# Altium PCB PCB3.PcbDoc
Units mm, origin at the board's own origin, x right, y up, seen from the top; angles counter-clockwise.
Board outline 119.13 x 133.35 mm, 4 copper layers (Top Layer, GND, VCC, Bottom Layer), stack 0.603 mm thick; 55 components, 46 nets, 276 pads, 242 vias.
Unrouted connection lines stored in the file: 1.
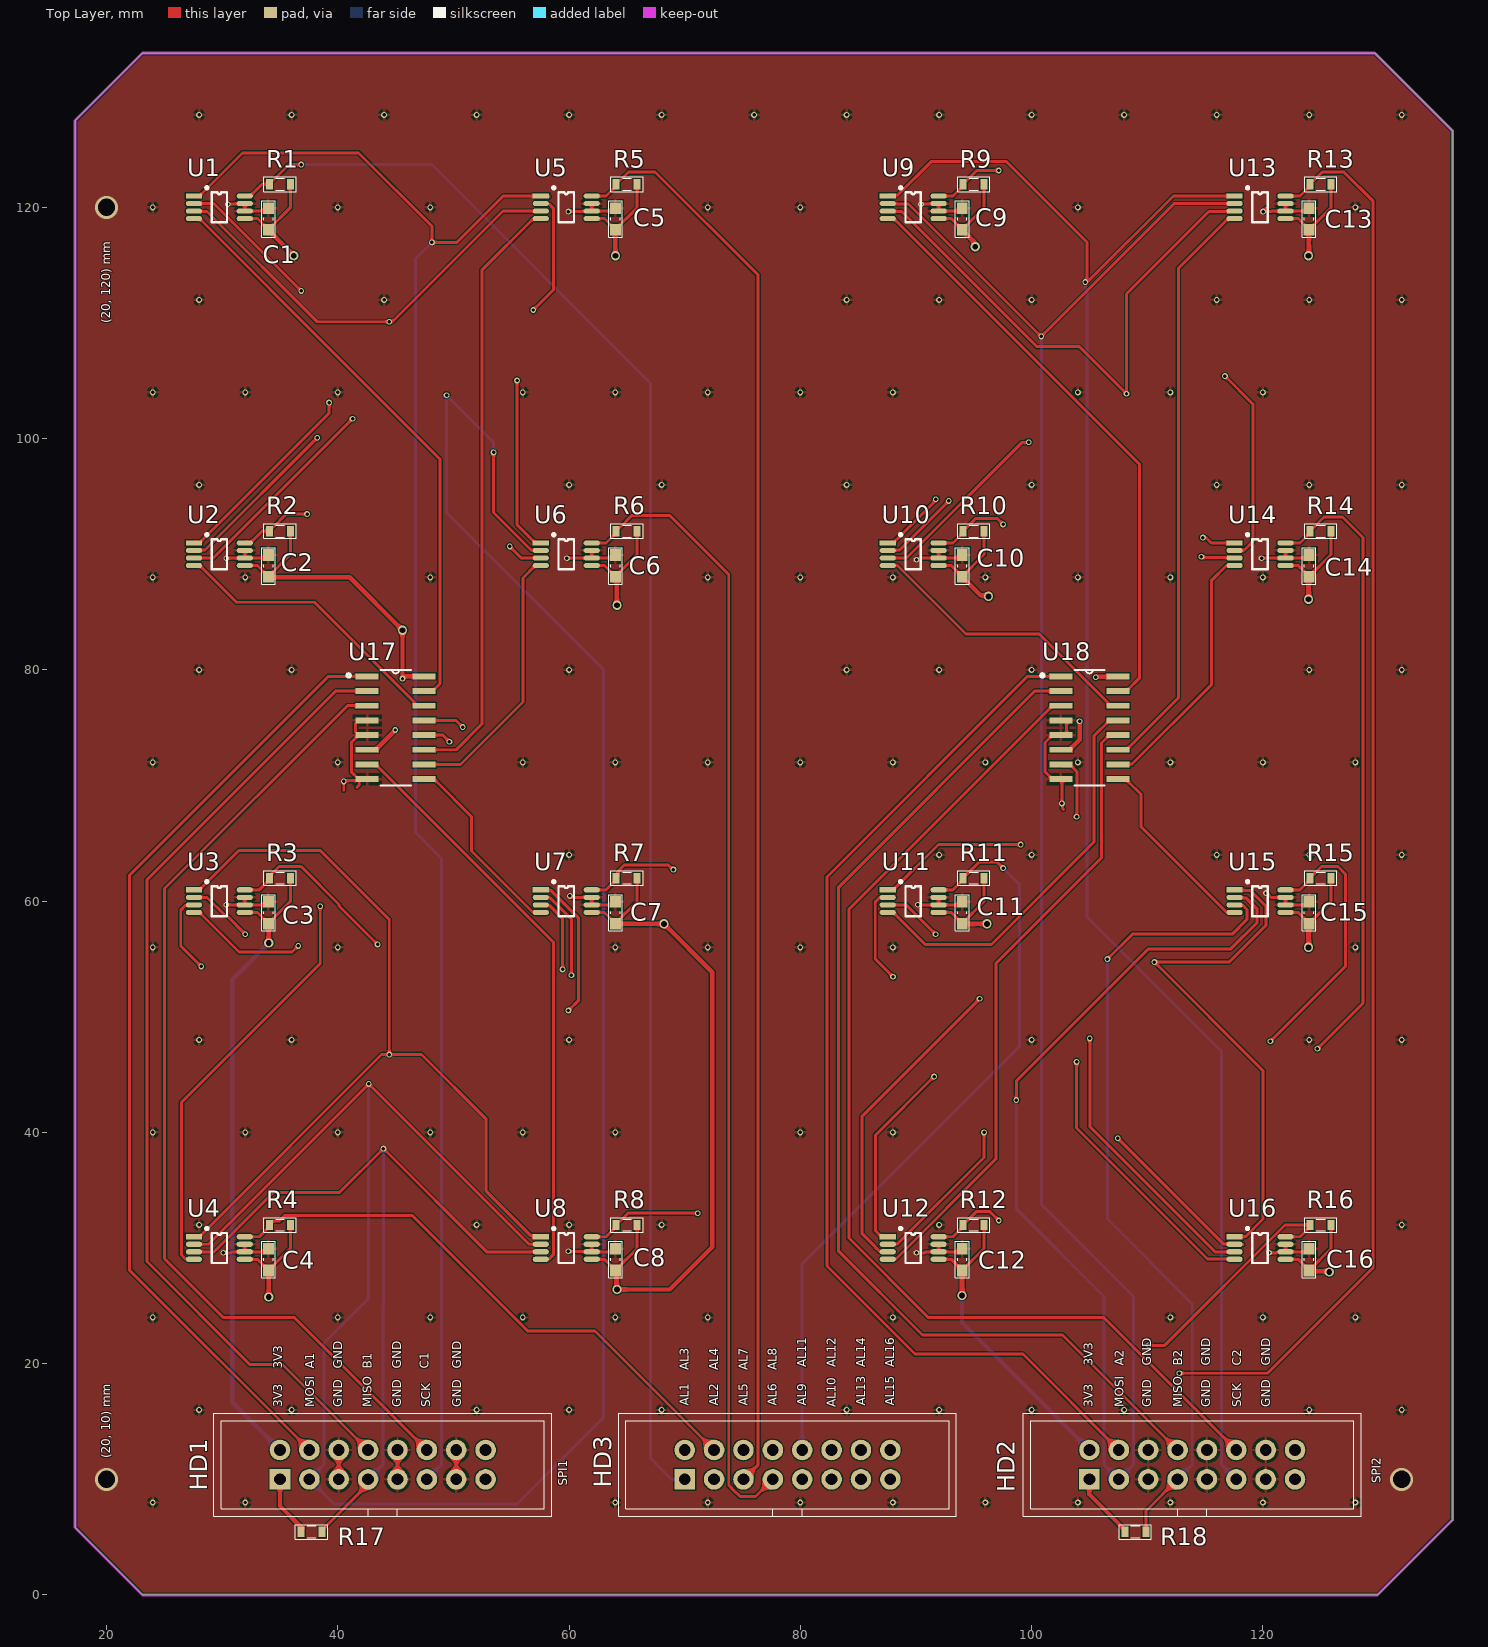
[diagram p0: Top Layer view]
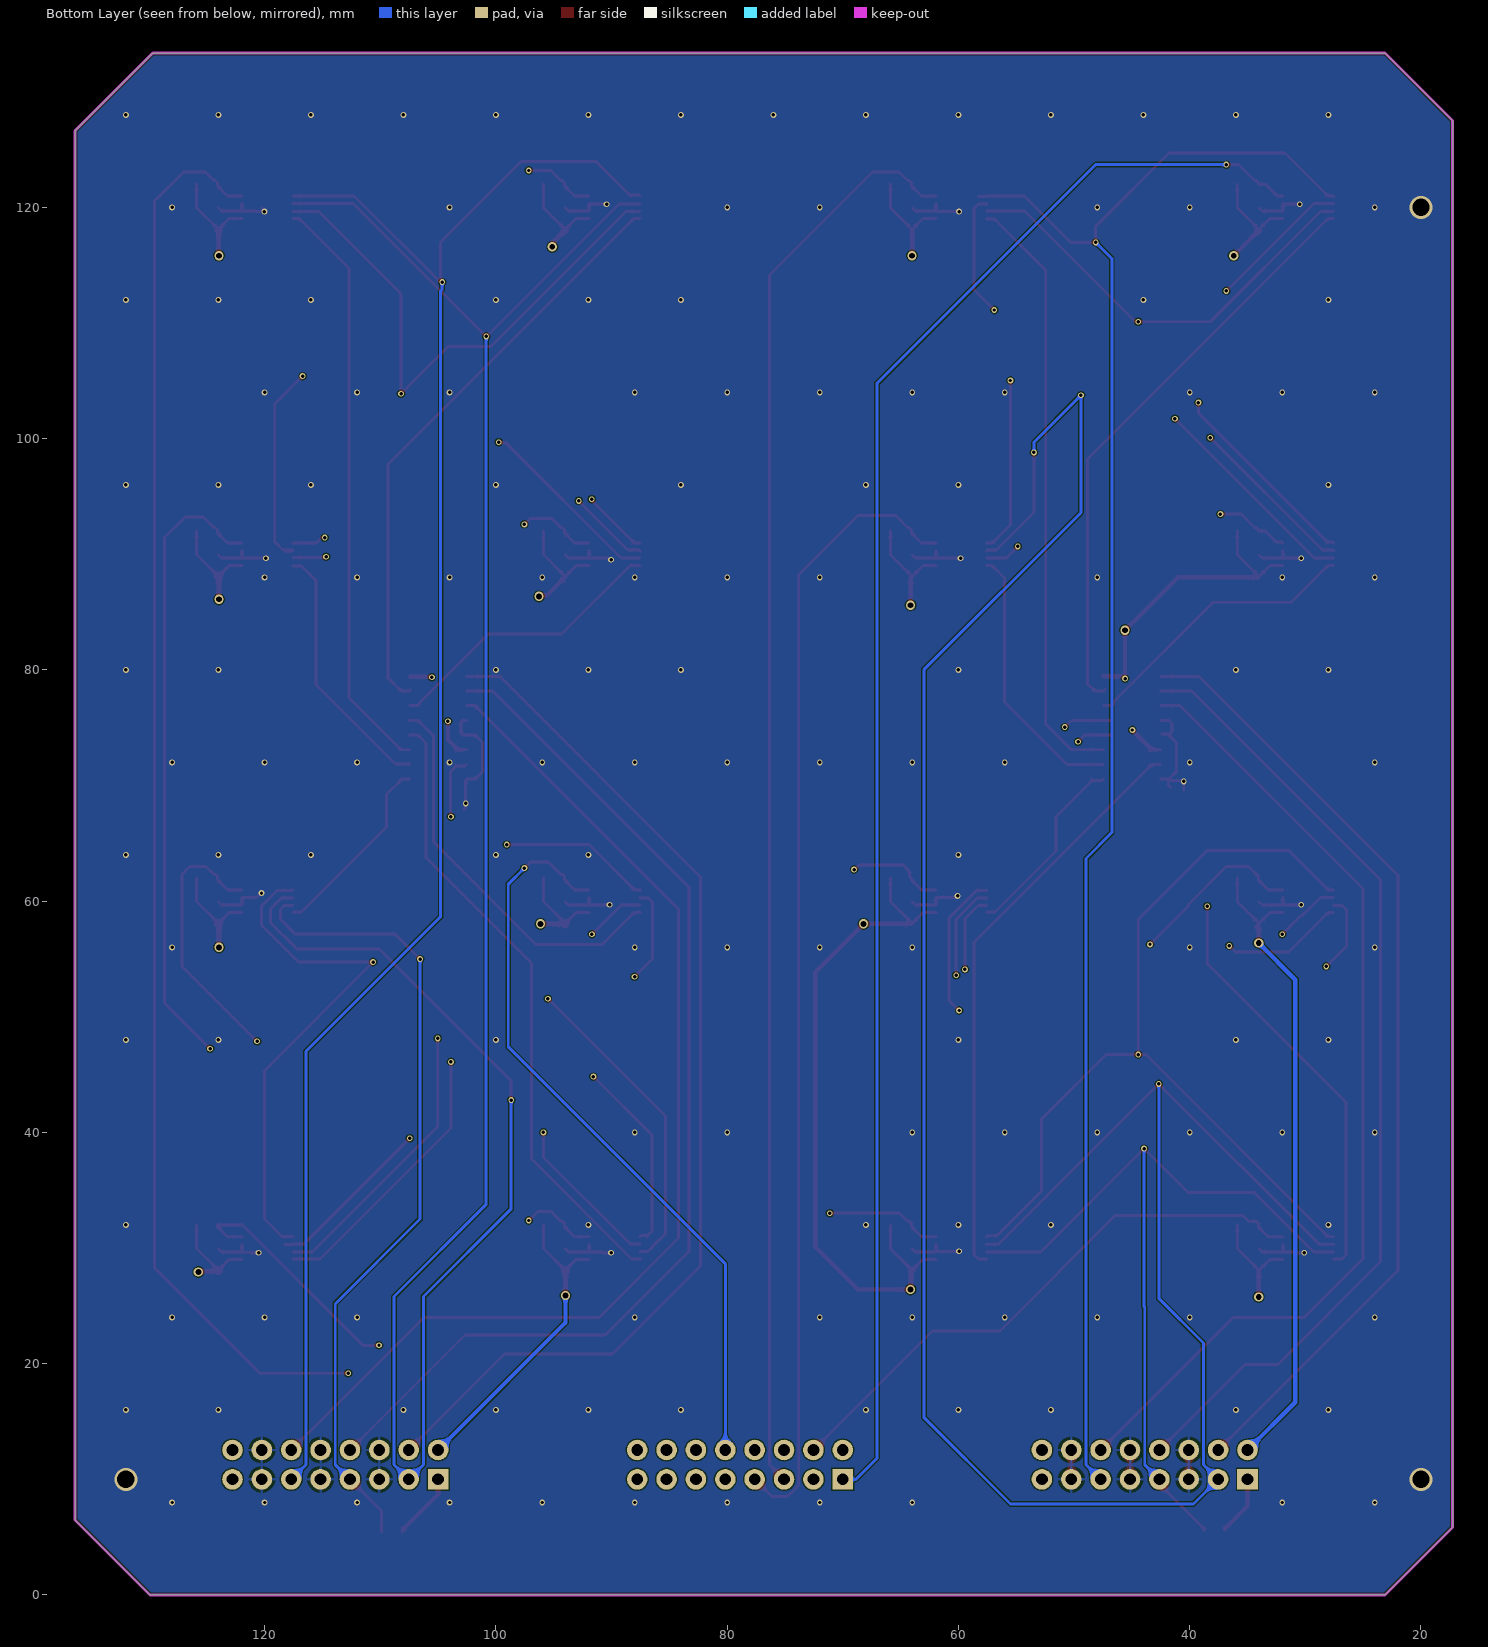
[diagram p1: Bottom Layer view, seen from below]
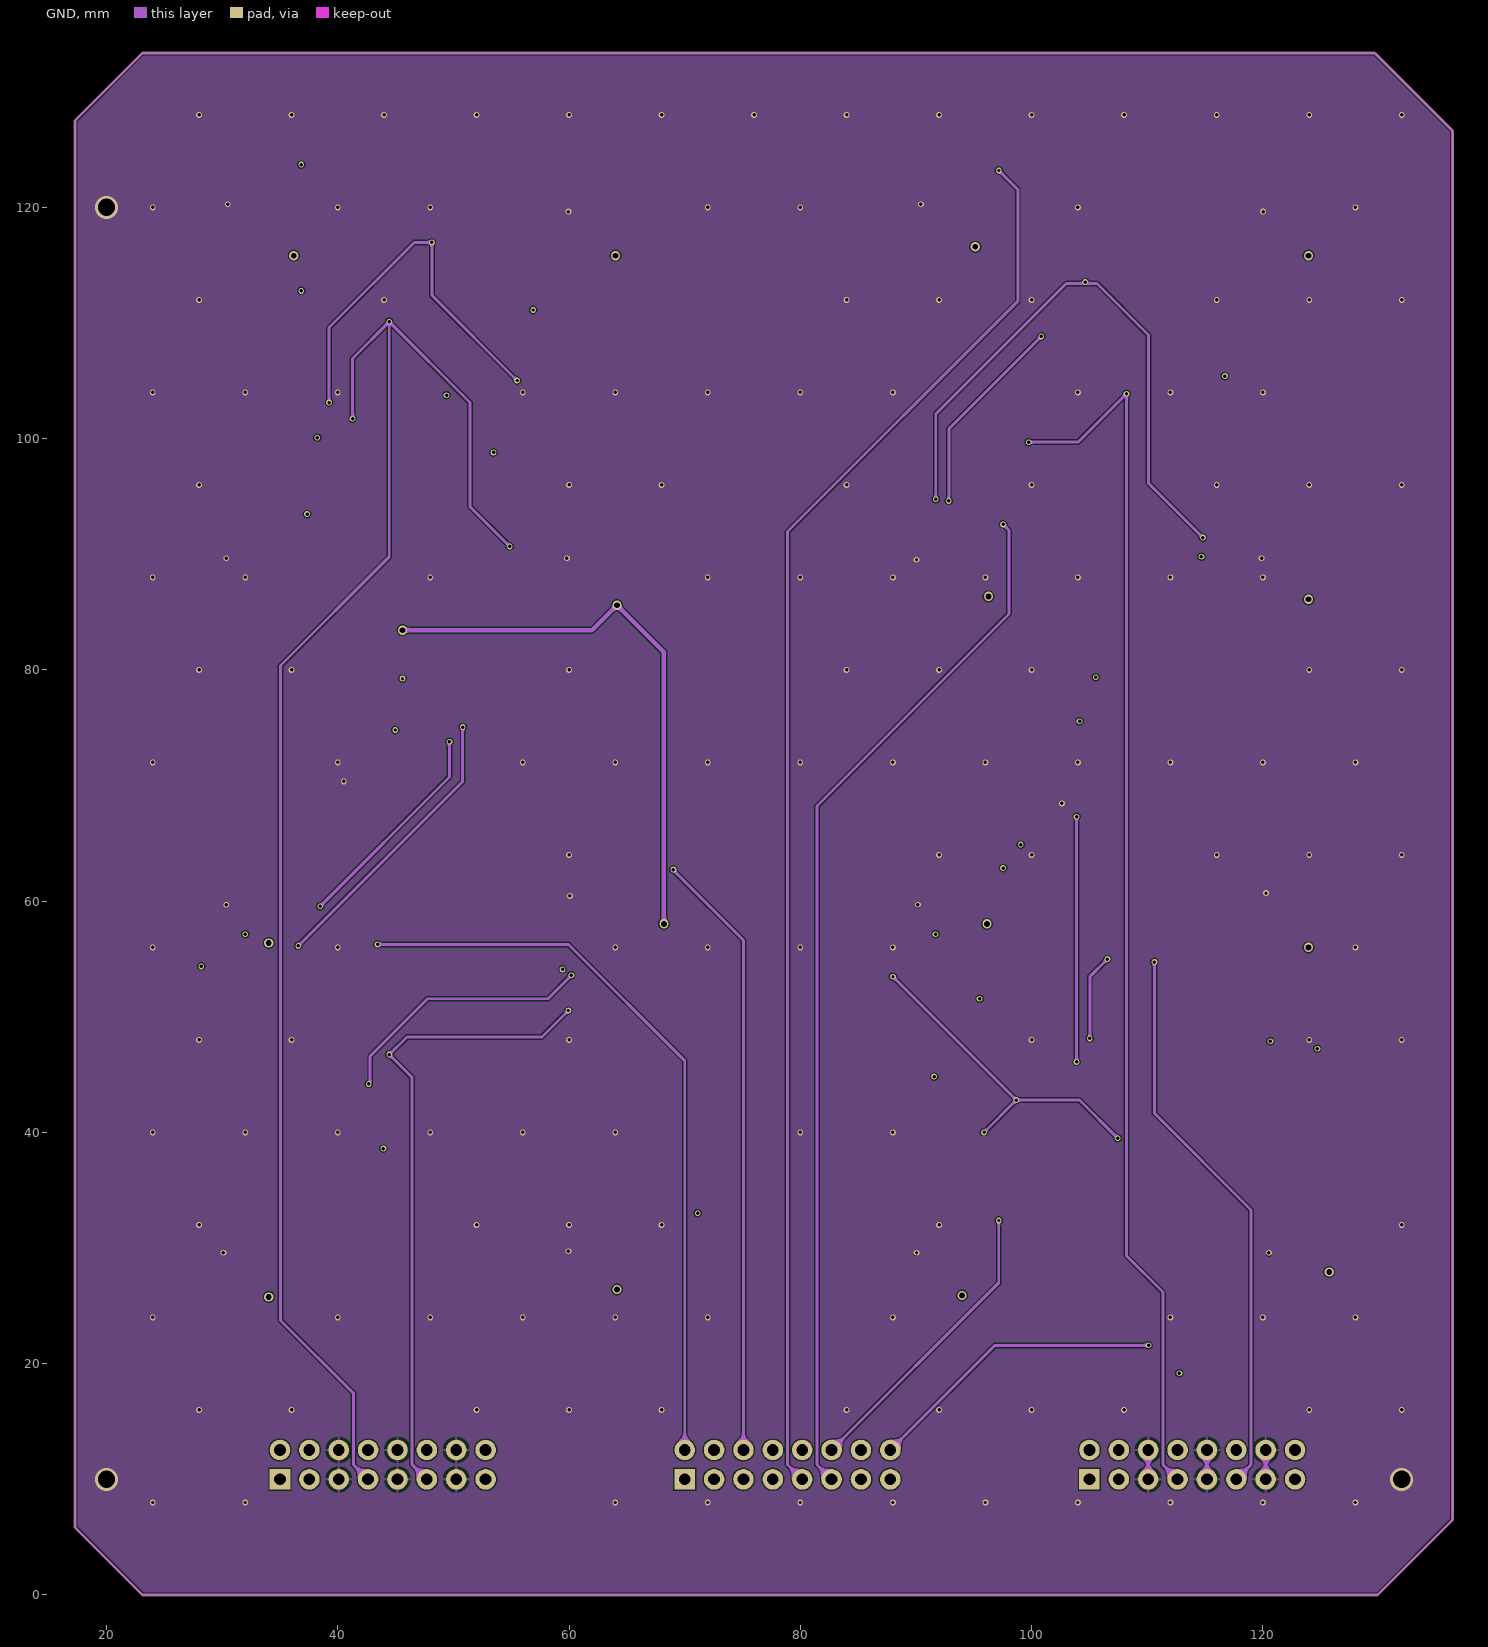
[diagram p2: GND]
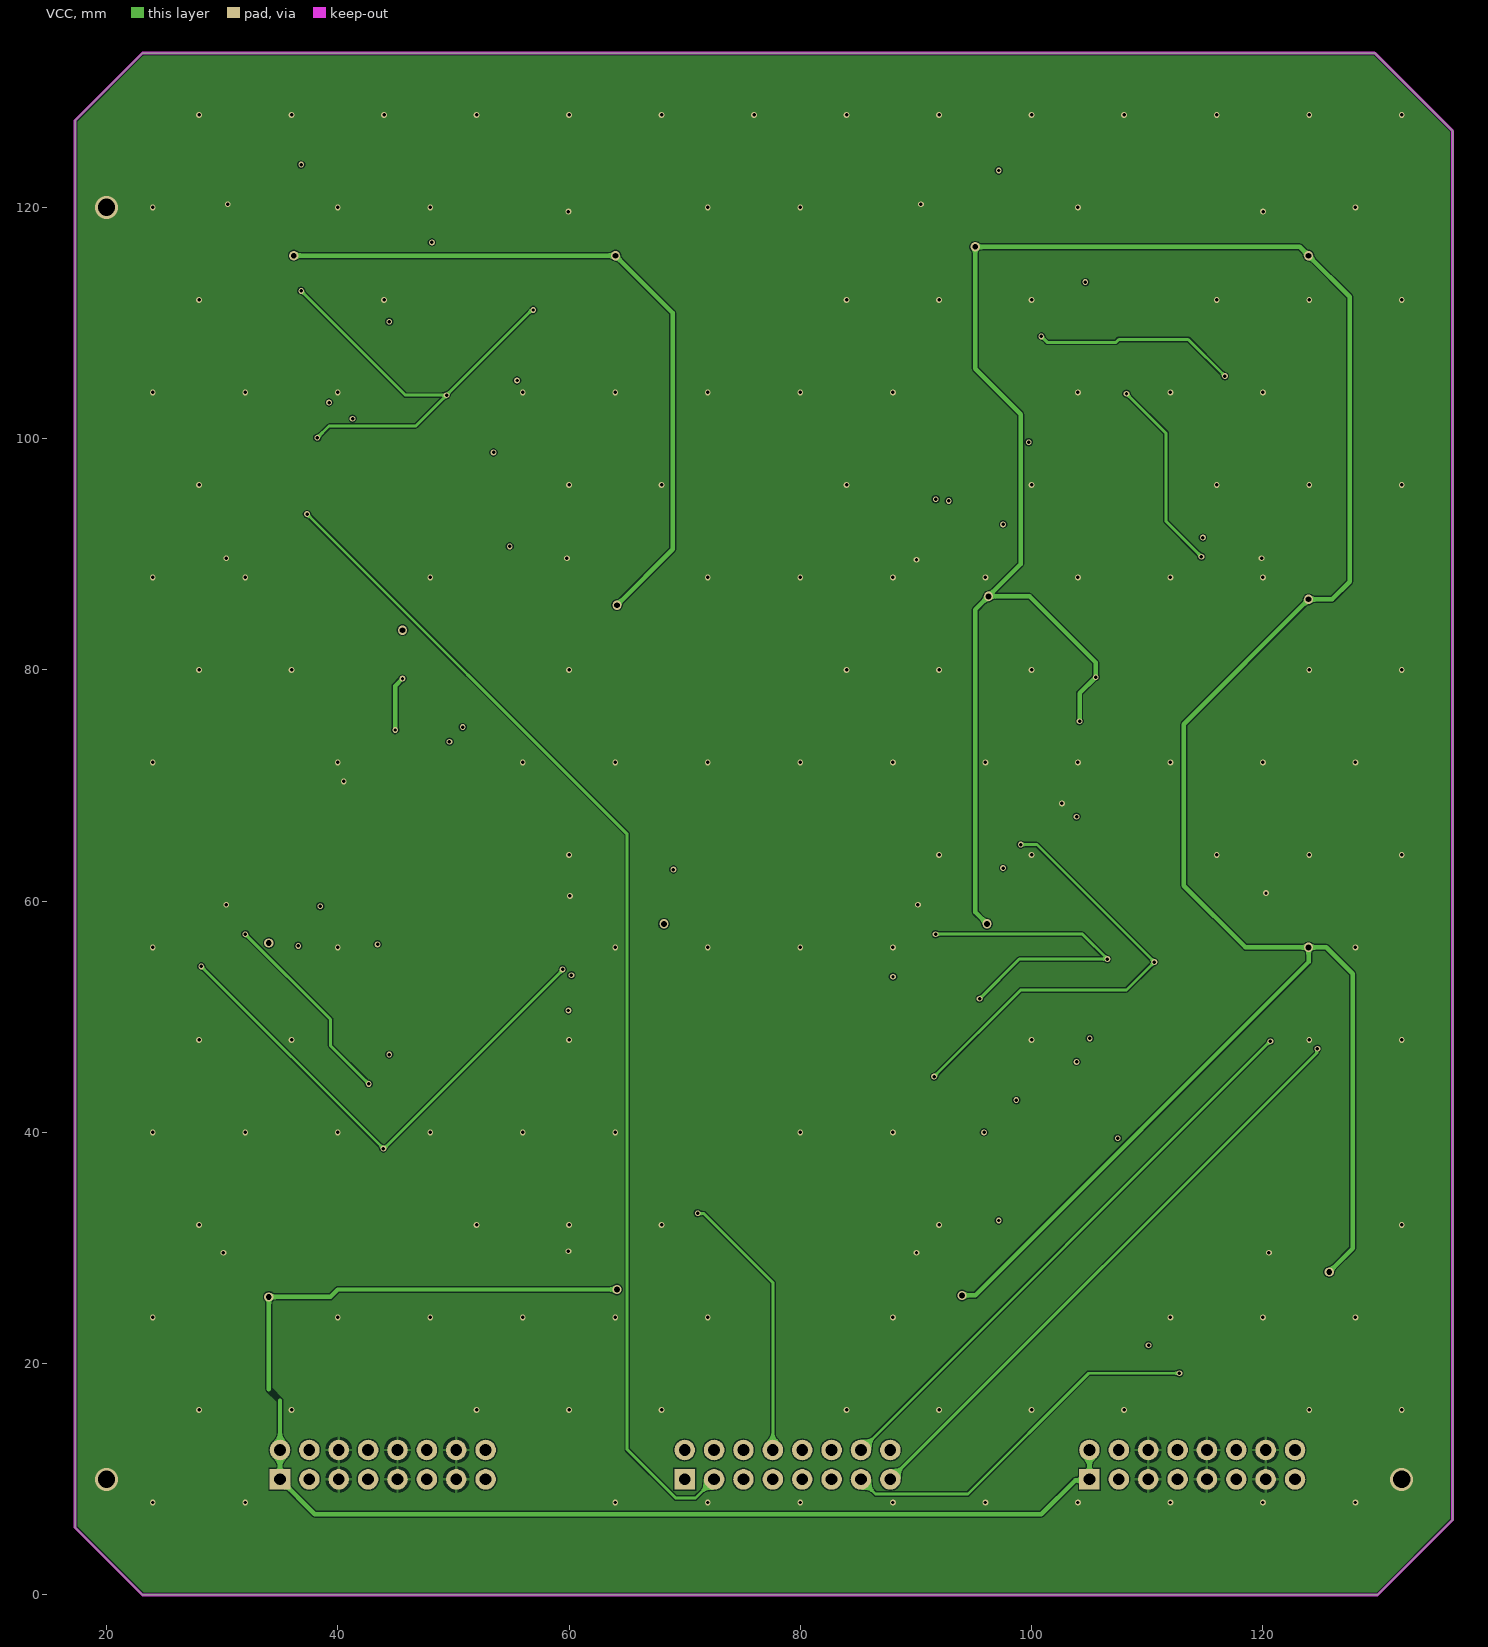
[diagram p3: VCC]
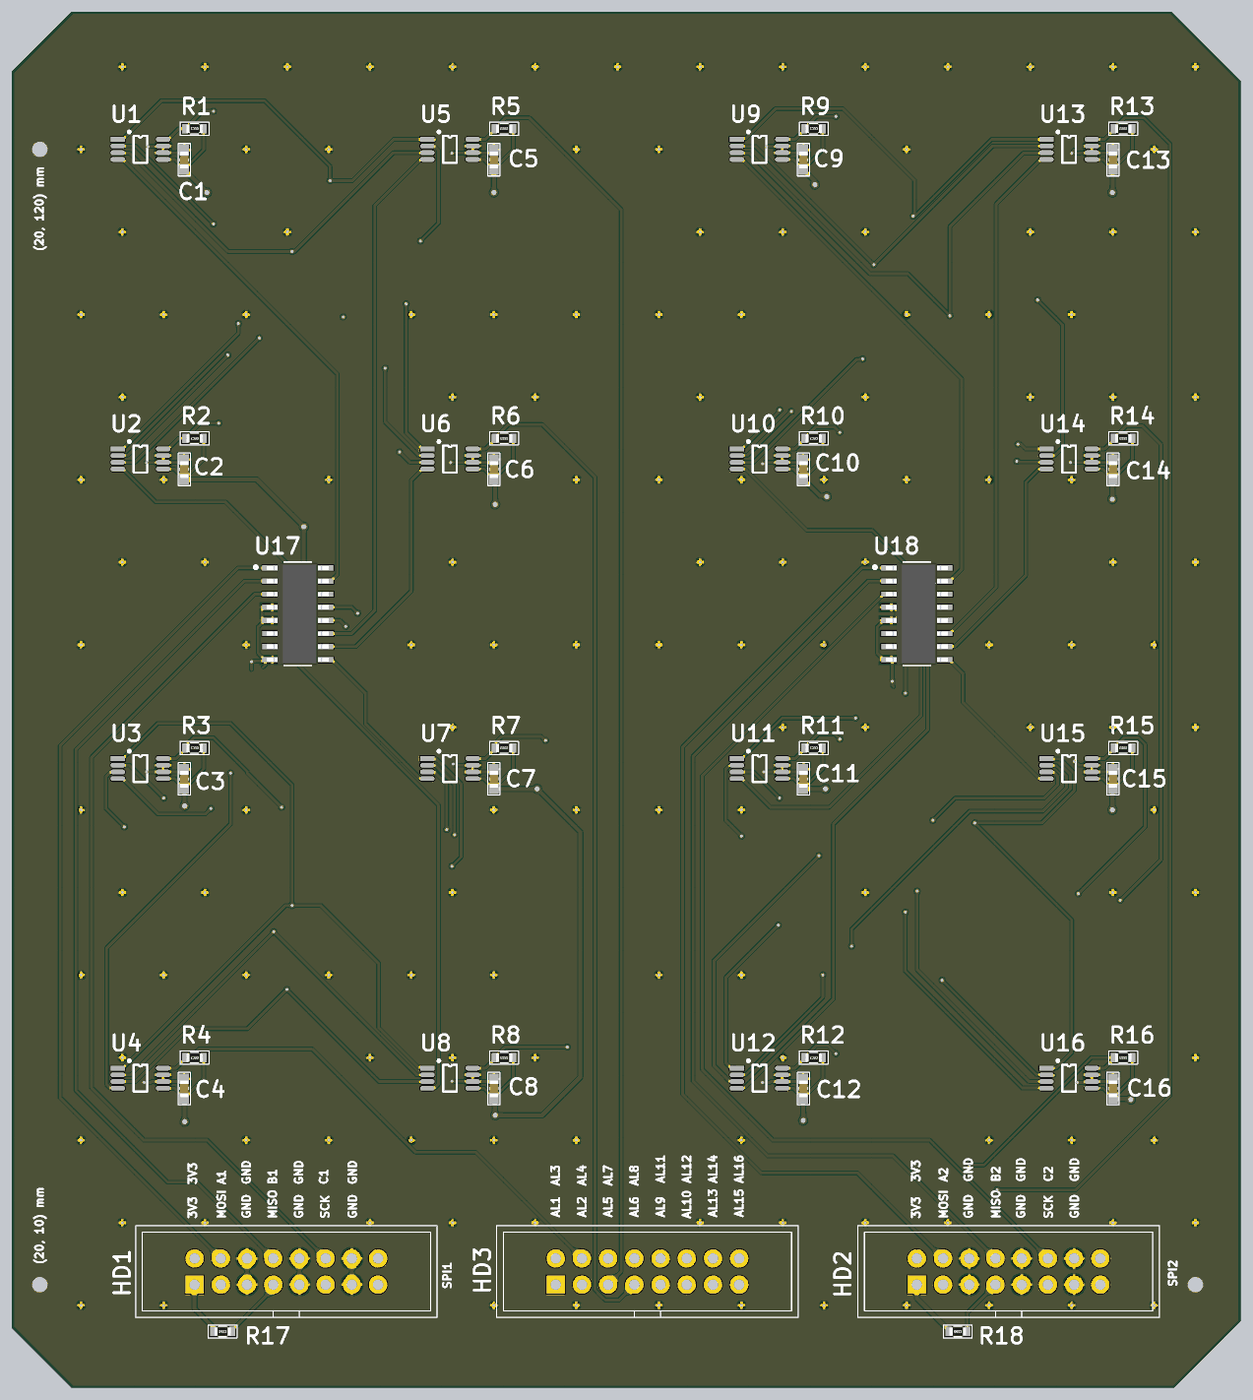
[diagram p4: 3D render of the assembled board from above, using the file's embedded part models]

## Layer stack, top to bottom
Top Solder: solder mask 0.0102, Solder Resist, Dk 3.5
Top Layer: signal copper 0.0356
Dielectric 2: prepreg 0.0711, PP-006, Dk 4.1
GND: signal copper 0.035
Dielectric5: dielectric 0.32, FR-4, Dk 4.8
VCC: signal copper 0.035
Dielectric 3: prepreg 0.0711, PP-006, Dk 4.1
Bottom Layer: signal copper 0.0356
Bottom Solder: solder mask 0.0102, Solder Resist, Dk 3.5

## Board outline
17.272,5.842 17.272,127.508 22.987,133.223 23.114,133.35 129.667,133.35 136.398,126.619 136.398,6.477 129.921,0 23.114,0

## Design rules (kind name [scope] priority, off if disabled: settings)
Clearance [All] p1: gap=0.1 ignorepadtopadclearanceinfootprint=TRUE
PolygonConnect [All] p1: connectstyle=Relief reliefconductorwidth=0.254 reliefentries=4 polygonreliefangle="90 Angle" airgapwidth=0.254
RoutingVias [All] p1 off: holewidth=0.711 width=1.27 viastyle="Through Hole" minholewidth=0.711 minwidth=1.27 maxholewidth=0.711 maxwidth=1.27
SolderMaskExpansion [All] p1: expansion=0.102 istentingtop=FALSE
UnRoutedNet [All] p1: checkbadconnections=TRUE
Width [All] p1: maxlimit=1.27 minlimit=0.254 preferedwidth=0.254 minimp=50.000000 maximp=50.000000 favimp=50.000000
29 further rules are at their usual default settings.

## Classes and differential pairs
component class SENSOR_ARRAY: C1 C2 C3 C4 C5 C6 C7 C8 C9 C10 C11 C12 C13 C14 C15 C16 R1 R2 R3 R4 R5 R6 R7 R8 R9 R10 R11 R12 R13 R14 R15 R16 R17 R18 U1 U2 U3 U4 U5 U6 U7 U8 U9 U10 U11 U12 U13 U14 U15 U16
component class DECODER: HD1 HD2 HD3 U17 U18

## Components (designator, comment, footprint, x,y, rotation, side; value= is the part's Value field where it differs from the comment)
C1 "100nF" CAP_0603 34,119 r270 top value=33p
C2 "100nF" CAP_0603 34,89 r270 top value=33p
C3 "100nF" CAP_0603 34,59 r270 top value=33p
C4 "100nF" CAP_0603 34,29 r270 top value=33p
C5 "100nF" CAP_0603 64,119 r270 top value=33p
C6 "100nF" CAP_0603 64,89 r270 top value=33p
C7 "100nF" CAP_0603 64,59 r270 top value=33p
C8 "100nF" CAP_0603 64,29 r270 top value=33p
C9 "100nF" CAP_0603 94,119 r270 top value=33p
C10 "100nF" CAP_0603 94,89 r270 top value=33p
C11 "100nF" CAP_0603 94,59 r270 top value=33p
C12 "100nF" CAP_0603 94,29 r270 top value=33p
C13 "100nF" CAP_0603 124,119 r270 top value=33p
C14 "100nF" CAP_0603 124,89 r270 top value=33p
C15 "100nF" CAP_0603 124,59 r270 top value=33p
C16 "100nF" CAP_0603 124,29 r270 top value=33p
HD1 "IDC 8X2" IDC16 35,10 r0 top value="Header 5x2"
HD2 "IDC 8X2" IDC16 105,10 r0 top value="Header 5x2"
HD3 "IDC 8X2" IDC16 70,10 r0 top value="Header 5x2"
R1 "10k" RES-SMD-0603 35,122 r180 top
R2 "10k" RES-SMD-0603 35,92 r180 top
R3 "10k" RES-SMD-0603 35,62 r180 top
R4 "10k" RES-SMD-0603 35,32 r180 top
R5 "10k" RES-SMD-0603 65,122 r180 top
R6 "10k" RES-SMD-0603 65,92 r180 top
R7 "10k" RES-SMD-0603 65,62 r180 top
R8 "10k" RES-SMD-0603 65,32 r180 top
R9 "10k" RES-SMD-0603 95,122 r180 top
R10 "10k" RES-SMD-0603 95,92 r180 top
R11 "10k" RES-SMD-0603 95,62 r180 top
R12 "10k" RES-SMD-0603 95,32 r180 top
R13 "10k" RES-SMD-0603 125,122 r180 top
R14 "10k" RES-SMD-0603 125,92 r180 top
R15 "10k" RES-SMD-0603 125,62 r180 top
R16 "10k" RES-SMD-0603 125,32 r180 top
R17 "10k" RES-SMD-0603 37.719,5.461 r0 top
R18 "10k" RES-SMD-0603 108.966,5.461 r0 top
U1 "TMAG5170" SOP8 30,120 r0 top
U2 "TMAG5170" SOP8 30,90 r0 top
U3 "TMAG5170" SOP8 30,60 r0 top
U4 "TMAG5170" SOP8 30,30 r0 top
U5 "TMAG5170" SOP8 60,120 r0 top
U6 "TMAG5170" SOP8 60,90 r0 top
U7 "TMAG5170" SOP8 60,60 r0 top
U8 "TMAG5170" SOP8 60,30 r0 top
U9 "TMAG5170" SOP8 90,120 r0 top
U10 "TMAG5170" SOP8 90,90 r0 top
U11 "TMAG5170" SOP8 90,60 r0 top
U12 "TMAG5170" SOP8 90,30 r0 top
U13 "TMAG5170" SOP8 120,120 r0 top
U14 "TMAG5170" SOP8 120,90 r0 top
U15 "TMAG5170" SOP8 120,60 r0 top
U16 "TMAG5170" SOP8 120,30 r0 top
U17 "SN74LVC138AD" SOIC127P600X175-16N 45,75 r0 top
U18 "SN74LVC138AD" SOIC127P600X175-16N 105,75 r0 top

## Footprints (in the part's own frame and the unit in brackets; to place one, negate y for a bottom-side part, rotate by r counter-clockwise, add the part's x,y. Pads: shape width x height; smd on the part's side, far side on the other; paste and mask are expansions set on the pad)
CAP_0603 [mm]
  rect 1x0.95 smd mask+0.076: 1(-0.94,0) 2(0.94,0)
  silkscreen extent -1.57,-0.58 1.57,0.58, body extent -0.77,-0.39 0.83,0.41, height 0.9
IDC16 [mil]
  rect 70x70 hole 40: 1(0,0)
  round 70 hole 40: 2(0,100) 3(100,0) 4(100,100) 5(200,0) 6(200,100) 7(300,0) 8(300,100) 9(400,0) 10(400,100) 11(500,0) 12(500,100) 13(600,0) 14(600,100) 15(700,0) 16(700,100)
  silkscreen extent -225,-125 925,225, body extent -225,-125 926,225, height 358
RES-SMD-0603 [mm]
  rect 0.6x0.9 smd: 1(-0.889,0) 2(0.927,0)
  silkscreen extent -1.4,-0.64 1.4,0.63, body extent -0.8,-0.4 0.8,0.4, height 0.43
SOIC127P600X175-16N [mil]
  rect 78x20 smd: 1(-97,175) 2(-97,125) 3(-97,75) 4(-97,25) 5(-97,-25) 6(-97,-75) 7(-97,-125) 8(-97,-175) 9(97,-175) 10(97,-125) 11(97,-75) 12(97,-25) 13(97,25) 14(97,75) 15(97,125) 16(97,175)
  silkscreen extent -166,-197 52,197, body extent -118,-195 118,195, height 69
SOP8 [mm]
  oval 1.4x0.45 smd: ALERT(1.956,0.98) CS(-2.444,-0.97) GND(1.956,-0.32) SDI(-2.444,0.33) SDO(-2.444,-0.32) TEST(1.956,0.33) VCC(1.956,-0.97)
  rect 1.4x0.45 smd: SCK(-2.444,0.98)
  silkscreen extent -1.43,-1.29 0.42,1.8

## Part data
C1 C2 C3 C4 C5 C6 C7 C8 C9 C10 C11 C12 C13 C14 C15 C16: library part CapSMD, "Capacitor", LatestRevisionDate=17-Jul-2002, LatestRevisionNote="Re-released for DXP Platform.", PackageReference=RAD-0.3, Published=8-Jun-2000, Publisher="Altium Limited"
HD1 HD2 HD3: library part "IDC 8x2"
R1 R2 R3 R4 R5 R6 R7 R8 R9 R10 R11 R12 R13 R14 R15 R16 R17 R18: library part "Resistor - SMD", "Resistor SMD", Manufacturer="Generic Components", Class=Passive, Published=08/06/2000, Publisher="Altium Hobart Technology Centre"
U17 U18: "3-Line To 8-Line decoder/Demultiplexer", Package="SOIC-16 Texas Instruments", Check_prices=https://www.snapeda.com/parts/SN74LVC138AD/Texas+Instruments/view-part/?ref=eda, MF="Texas Instruments", MP=SN74LVC138AD, SnapEDA_Link=https://www.snapeda.com/parts/SN74LVC138AD/Texas+Instruments/view-part/?ref=snap

## Via types
v1: diameter 0.5, hole 0.3, Top Layer to Bottom Layer, 143 vias
v2: diameter 0.5, hole 0.3, Top Layer to Bottom Layer, tented top, 80 vias
v3: diameter 0.8, hole 0.5, Top Layer to Bottom Layer, tented top, 16 vias
v4: diameter 2, hole 1.5, Top Layer to Bottom Layer, tented top, 3 vias

## Nets (pads, with @x,y where several pads share a name; then routed paths per layer and width w, separated by ;. In a path a pad name is that pad's centre, name@x,y a point inside that pad or via, vN(x,y) a via of type N, cw(c..) or ccw(c..) an arc to the next point about the centre after c; other vN are vias at no path point)
3V3: C1.2 C2.2 C3.2 C4.2 C5.2 C6.2 C7.2 C8.2 C9.2 C10.2 C11.2 C12.2 C13.2 C14.2 C15.2 C16.2 HD1.1 HD1.2 HD2.1 HD2.2 R1.1 R2.1 R3.1 R4.1 R5.1 R6.1 R7.1 R8.1 R9.1 R10.1 R11.1 R12.1 R13.1 R14.1 R15.1 R16.1 R17.1 R18.1 U1.VCC U2.VCC U3.VCC U4.VCC U5.VCC U6.VCC U7.VCC U8.VCC U9.VCC U10.VCC U11.VCC U12.VCC U13.VCC U14.VCC U15.VCC U16.VCC U17.6 U17.16 U18.6 U18.16 | length 788.2
  Top Layer w0.254: U4.VCC 33.055,29.03 34,28.085 35.889,29.974 R4.1 ; U3.VCC 33.055,59.03 C3.2@34,58.085 ; U2.VCC 33.055,89.03 C2.2@34,88.085 ; U1.VCC 33.055,119.03 C1.2@34,118.085 ; C3.2@34,58.035 C3.2@34.25,57.785 ; C3.2 C3.2@34,58.085 ; C2.2@34.049,88.011 C2.2 C2.2@34,88.085 ; C1.2@34.077,117.983 C1.2 C1.2@34,118.085 ; R3.1 35.889,59.974 C3.2@34,58.085 ; R2.1 35.889,89.974 C2.2@34,88.085 ; R1.1 35.889,119.974 C1.2@34,118.085 ; R17.1@36.957,5.588 R17.1@36.957,5.738 ; U17.6 U17.6@43.273,73.095 ; v2@44.958,74.78 v2(44.958,74.803) ; v2(45.593,79.248) 45.66,79.248 45.857,79.445 ; U8.VCC 63.055,29.03 C8.2@64,28.085 ; U7.VCC 63.055,59.03 64,58.085 65.889,59.974 R7.1 ; U6.VCC 63.055,89.03 C6.2@64,88.085 ; U5.VCC 63.055,119.03 C5.2@64,118.085 ; C7.2 C7.2@64.021,58.039 ; C8.2@64.008,28.077 C8.2@64,28.085 ; C5.2@64.008,118.052 C5.2 C5.2@64,118.085 ; C6.2@64.135,87.925 C6.2 C6.2@64,88.085 ; R8.1 65.889,29.974 C8.2@64,28.085 ; R6.1 65.889,89.974 C6.2@64,88.085 ; R5.1 65.889,119.974 C5.2@64,118.085 ; U12.VCC 93.055,29.03 C12.2@94,28.085 ; U11.VCC 93.055,59.03 C11.2@94,58.085 ; U10.VCC 93.055,89.03 C10.2@94,88.085 ; U9.VCC 93.055,119.03 94,118.085 95.889,119.974 R9.1 ; C10.2@93.98,88.04 C10.2 C10.2@94,88.085 ; C12.2 C12.2@94,28.085 ; C11.2 C11.2@94,58.085 ; R12.1 95.889,29.974 C12.2@94,28.085 ; R11.1 95.889,59.974 C11.2@94,58.085 ; R10.1 95.889,89.974 C10.2@94,88.085 ; U18.6 U18.6@103.273,73.095 ; v2(105.537,79.375) v2@105.572,79.41 ; U18.16@107.429,79.41 U18.16 ; R18.1 R18.1@108.077,5.611 ; U16.VCC 123.055,29.03 C16.2@124,28.085 ; U15.VCC 123.055,59.03 C15.2@124,58.085 ; U14.VCC 123.055,89.03 124,88.085 125.889,89.974 R14.1 ; U13.VCC 123.055,119.03 C13.2@124,118.085 ; C16.2 C16.2@124,28.085 ; C15.2 C15.2@124,58.085 ; C13.2 C13.2@124,118.085 ; R16.1 125.889,29.974 C16.2@124,28.085 ; R15.1 125.889,59.974 C15.2@124,58.085 ; R13.1 125.889,119.974 C13.2@124,118.085
  Top Layer w0.381: C4.2 34.018,28.042 34.018,25.799 v3(34.036,25.781) ; v3(34.036,56.388) 34.018,56.406 34.018,57.751 34.052,57.785 C3.2@34.25,57.785 ; C2.2@34.049,88.011 41.021,88.011 v3(45.593,83.439) v2(45.593,79.248) ; C1.2@34.077,117.958 36.195,115.84 v3(36.195,115.824) ; HD1.1 35,7.695 R17.1@36.957,5.738 ; U17.6@43.273,73.095 v2@44.958,74.78 ; 45.857,79.445 U17.16 ; v3(64.008,115.824) C5.2@64.008,118.052 ; C7.2@64.021,58.039 v3(68.199,58.039) 72.39,53.848 72.39,30.099 68.707,26.416 v3(64.135,26.416) ; v3@64.103,26.448 C8.2@64.103,27.982 ; v3(64.135,85.598) C6.2@64.135,87.925 ; C10.2@93.98,88.04 93.995,88.04 95.595,86.44 96.186,86.44 v3(96.266,86.36) ; v3@93.987,25.915 C12.2@93.987,28.047 ; C9.2@94,118.035 v3@95.091,116.944 ; C11.2@94.021,58.039 v3(96.139,58.039) ; U18.6@103.273,73.095 104.144,73.966 v2(104.144,75.565) ; HD2.1 105,8.688 R18.1@108.077,5.611 ; v2@105.572,79.41 U18.16@107.429,79.41 ; v3@123.959,56.014 C15.2@123.959,58.019 ; v3@123.959,86.113 C14.2@123.959,88.044 ; v3@123.976,115.848 C13.2@123.976,118.036 ; C16.2@124,28.035 124.035,28 125.67,28 v3(125.73,27.94)
  Top Layer w0.635: C1.2@34.077,117.958 C1.2@34.077,117.983 ; C8.2@64.008,28.077 C8.2@64.103,27.982 ; v3@64.103,26.448 v3(64.135,26.416) ; C9.2@94,118.035 C9.2 ; v3(123.952,115.824) v3@123.976,115.848 ; C13.2@123.976,118.036 C13.2
  Top Layer w0.762: v3(93.98,25.908) v3@93.987,25.915 ; C12.2@93.987,28.047 C12.2 ; C11.2 C11.2@94.021,58.039 ; v3(123.952,56.007) v3@123.959,56.014 ; v3(123.952,86.106) v3@123.959,86.113 ; C15.2@123.959,58.019 C15.2 ; C14.2@123.959,88.044 C14.2@124,88.085 ; C16.2@124,28.035 C16.2
  GND w0.381: v3(45.593,83.439) 61.976,83.439 v3(64.135,85.598) 68.199,81.534 v3(68.199,58.039)
  VCC w0.381: 34.036,17.78 v3(34.036,25.781) 39.37,25.781 40.005,26.416 v3(64.135,26.416) ; 35,16.816 HD1.2 HD1.1 38.015,6.985 100.838,6.985 103.763,9.91 104.91,9.91 HD2.1 HD2.2 ; v3(36.195,115.824) v3(64.008,115.824) 68.961,110.871 68.961,90.424 v3(64.135,85.598) ; v2(44.958,74.803) 44.958,78.613 v2(45.593,79.248) ; v3(93.98,25.908) 95.123,25.908 123.952,54.737 v3(123.952,56.007) ; v3(96.139,58.039) 95.123,59.055 95.123,85.217 v3(96.266,86.36) ; v2(104.144,75.565) 104.144,77.982 v2(105.537,79.375) 105.537,80.645 99.822,86.36 v3(96.266,86.36) ; v3(125.73,27.94) 127.762,29.972 127.762,53.721 125.476,56.007 v3(123.952,56.007) ; v3(96.266,86.36) 99.06,89.154 99.06,102.108 95.123,106.045 v3(95.123,116.586) 123.19,116.586 v3(123.952,115.824) 127.508,112.268 127.508,87.63 125.984,86.106 v3(123.952,86.106) 113.157,75.311 113.157,61.341 118.491,56.007 v3(123.952,56.007)
  Bottom Layer w0.381: v3(34.036,56.388) 30.861,53.213 30.861,16.679 HD1.2 ; v3(93.98,25.908) 93.98,23.56 HD2.2
A1: HD1.4 U17.1 | length 83.8
  Top Layer w0.254: HD1.4 21.971,28.109 21.971,62.23 39.186,79.445 U17.1
A2: HD2.4 U18.1 | length 92.9
  Top Layer w0.254: U18.1 99.638,79.445 82.296,62.103 82.296,28.448 89.914,20.83 99.25,20.83 HD2.4
AL1: HD3.1 R1.2 U1.ALERT | length 140.8
  Top Layer w0.254: U1.ALERT 32.431,120.98 33.45,122 R1.2 34.073,122.15 34.246,122.323 34.396,122.323 35.771,123.698 v2(36.83,123.698)
  Bottom Layer w0.254: v2(36.83,123.698) 48.133,123.698 67.056,104.775 67.056,11.811 68.867,10 HD3.1
AL2: HD3.3 R2.2 U2.ALERT | length 108.8
  Top Layer w0.254: U2.ALERT 32.02,91.044 32.495,91.044 33.45,92 R2.2 34.073,92.15 34.246,92.323 34.396,92.323 35.545,93.472 v2(37.338,93.472)
  VCC w0.254: v2(37.338,93.472) 65.024,65.786 65.024,12.573 69.215,8.382 70.922,8.382 HD3.3
AL3: HD3.2 R3.2 U3.ALERT | length 79.7
  Top Layer w0.254: U3.ALERT 33.204,60.98 34.073,61.85 R3.2 34.073,62.15 34.915,62.992 36.83,62.992 40.108,59.714 40.108,59.587 v2(43.434,56.261)
  GND w0.254: v2(43.434,56.261) 59.944,56.261 70,46.205 HD3.2
AL4: HD3.4 R4.2 U4.ALERT | length 49.9
  Top Layer w0.254: U4.ALERT 33.204,30.98 34.073,31.85 R4.2 34.073,32.15 34.246,32.323 34.923,32.323 35.431,32.831 46.417,32.831 56.417,22.831 62.249,22.831 HD3.4
AL5: HD3.5 R5.2 U5.ALERT | length 123.8
  Top Layer w0.254: U5.ALERT 63.204,120.98 64.073,121.85 R5.2 64.073,122.15 64.246,122.323 64.396,122.323 65.136,123.063 67.437,123.063 76.35,114.15 76.35,11.27 HD3.5
AL6: HD3.7 R6.2 U6.ALERT | length 99
  Top Layer w0.254: U6.ALERT 63.204,90.98 64.073,91.85 R6.2 64.073,92.15 64.246,92.323 64.396,92.323 65.418,93.345 68.707,93.345 73.81,88.242 73.81,9.502 74.038,9.274 ; HD3.7 76.129,8.509 74.908,8.509 74.803,8.509 74.203,9.081 ; 74.038,9.274 ccw(c75.08,10) 74.203,9.081 ; 74.038,9.274 ccw(c75.08,10) 74.203,9.081
AL7: HD3.6 R7.2 U7.ALERT | length 61.2
  Top Layer w0.254: U7.ALERT 63.204,60.98 64.073,61.85 R7.2 64.246,62.173 64.246,62.595 64.77,63.119 68.58,63.119 68.961,62.738 v2(69.02,62.738)
  GND w0.254: v2(69.02,62.738) 69.02,62.678 75.08,56.619 HD3.6
AL8: HD3.8 R8.2 U8.ALERT | length 33.7
  Top Layer w0.254: U8.ALERT 63.204,30.98 64.073,31.85 R8.2 64.073,32.15 64.246,32.323 64.396,32.323 65.093,33.02 v2(71.12,33.02)
  VCC w0.254: v2(71.12,33.02) 71.167,32.973 71.675,32.973 77.62,27.028 HD3.8
AL9: HD3.9 R9.2 U9.ALERT | length 128.9
  Top Layer w0.254: U9.ALERT 93.204,120.98 94.073,121.85 R9.2 94.073,122.15 94.246,122.323 94.396,122.323 95.263,123.19 v2(97.155,123.19)
  GND w0.254: HD3.9 78.964,11.196 78.89,11.27 78.89,12.529 ccw(c77.62,12.54) 78.89,12.533 78.89,12.551 78.89,91.971 98.806,111.887 98.806,121.539 v2(97.155,123.19)
AL10: HD3.11 R10.2 U10.ALERT | length 97
  Top Layer w0.254: U10.ALERT 93.204,90.98 94.073,91.85 R10.2 94.073,92.15 94.246,92.323 94.396,92.323 95.164,93.091 97.028,93.091 v2(97.536,92.583)
  GND w0.254: HD3.11 81.43,11.27 81.43,68.222 98.044,84.836 98.044,92.075 v2(97.536,92.583)
AL11: HD3.10 R11.2 U11.ALERT | length 65.6
  Top Layer w0.254: U11.ALERT 93.204,60.98 94.073,61.85 R11.2 94.073,62.15 94.246,62.323 94.396,62.323 95.446,63.373 97.028,63.373 v2(97.536,62.865)
  Bottom Layer w0.254: HD3.10 80.16,28.639 98.933,47.412 98.933,61.468 v2(97.536,62.865)
AL12: HD3.12 R12.2 U12.ALERT | length 32.4
  Top Layer w0.254: U12.ALERT 93.204,30.98 94.073,31.85 R12.2 94.073,32.15 94.246,32.323 94.396,32.323 95.22,33.147 96.393,33.147 v2(97.155,32.385)
  GND w0.254: HD3.12 97.155,26.995 v2(97.155,32.385)
AL13: HD3.13 R13.2 U13.ALERT | length 154.8
  Top Layer w0.254: v2(112.776,19.177) 120.396,19.177 129.54,28.321 129.54,120.523 127,123.063 125.136,123.063 124.396,122.323 124.246,122.323 124.073,122.15 R13.2 124.073,121.85 123.204,120.98 U13.ALERT
  VCC w0.254: HD3.13 86.51,8.73 94.488,8.73 104.935,19.177 v2(112.776,19.177)
AL14: HD3.15 R14.2 U14.ALERT | length 106.9
  Top Layer w0.254: U14.ALERT 123.204,90.98 124.073,91.85 R14.2 124.073,92.15 124.246,92.323 124.396,92.323 125.291,93.218 126.873,93.218 128.651,91.44 128.651,51.181 v2(124.714,47.244)
  VCC w0.254: HD3.15 124.667,46.887 124.667,47.197 v2(124.714,47.244)
AL15: HD3.14 R15.2 U15.ALERT | length 73.7
  Top Layer w0.254: v2(120.65,47.879) 127.127,54.356 127.127,62.357 126.492,62.992 125.065,62.992 124.396,62.323 124.246,62.323 124.073,62.15 R15.2 124.073,61.85 123.204,60.98 U15.ALERT
  VCC w0.254: HD3.14 85.275,12.54 120.615,47.879 v2(120.65,47.879)
AL16: HD3.16 R16.2 U16.ALERT | length 47
  Top Layer w0.254: v2(110.109,21.59) 111.506,21.59 121.916,32 R16.2 124.073,31.85 123.204,30.98 U16.ALERT
  GND w0.254: HD3.16 96.83,21.59 v2(110.109,21.59)
B1: HD1.8 U17.2 | length 84.7
  Top Layer w0.254: U17.2 39.821,78.175 23.495,61.849 23.495,28.829 32.385,19.939 35.221,19.939 HD1.8
B2: HD2.8 U18.2 | length 94.2
  Top Layer w0.254: U18.2 100.273,78.175 83.312,61.214 83.312,29.718 90.551,22.479 102.681,22.479 HD2.8
C1: HD1.12 U17.3 | length 85.6
  Top Layer w0.254: U17.3 40.837,76.905 25.019,61.087 25.019,29.083 30.097,24.005 36.235,24.005 HD1.12
C2: HD2.12 U18.3 | length 95.2
  Top Layer w0.254: U18.3 101.8,76.905 84.201,59.306 84.201,30.861 91.059,24.003 106.237,24.003 HD2.12
GND: C1.1 C2.1 C3.1 C4.1 C5.1 C6.1 C7.1 C8.1 C9.1 C10.1 C11.1 C12.1 C13.1 C14.1 C15.1 C16.1 HD1.5 HD1.6 HD1.9 HD1.10 HD1.13 HD1.14 HD2.5 HD2.6 HD2.9 HD2.10 HD2.13 HD2.14 U1.GND U1.TEST U2.GND U2.TEST U3.GND U3.TEST U4.GND U4.TEST U5.GND U5.TEST U6.GND U6.TEST U7.GND U7.TEST U8.GND U8.TEST U9.GND U9.TEST U10.GND U10.TEST U11.GND U11.TEST U12.GND U12.TEST U13.GND U13.TEST U14.GND U14.TEST U15.GND U15.TEST U16.GND U16.TEST U17.4 U17.5 U17.8 U18.4 U18.5 U18.8 | length 111.7
  Top Layer w0.254: v2(30.103,29.591) 30.772,29.591 30.861,29.68 U4.GND ; v2@30.286,89.662 v2(30.353,89.662) 30.362,89.671 31.947,89.671 U2.GND ; v2@30.353,59.757 v2(30.353,59.69) 30.358,59.685 31.951,59.685 U3.GND ; v2(30.48,120.269) v2@30.511,120.3 ; v2@30.527,120.316 v2@30.511,120.3 ; U3.TEST@31.953,60.328 U3.TEST U3.GND ; U4.TEST U4.GND ; U2.TEST U2.GND ; C4.1 33.74,29.68 U4.GND ; C3.1 33.74,59.68 U3.GND ; C2.1 33.74,89.68 U2.GND ; C1.1 33.74,119.68 U1.GND U1.TEST 31.925,120.3 v2@30.511,120.3 ; HD1.5 HD1.6 ; 40.513,69.596 v2(40.513,70.358) 40.58,70.358 40.65,70.428 41.673,70.428 U17.8@41.8,70.555 ; 41.656,69.85 41.854,70.048 41.854,70.428 U17.8@41.981,70.555 ; U17.5@41.8,74.365 41.165,73.73 41.165,71.19 U17.8@41.8,70.555 ; U17.5@42.437,74.464 41.701,74.464 41.529,74.636 41.529,75.364 41.8,75.635 U17.4 ; U17.8 U17.8@41.981,70.555 ; HD1.9 HD1.10 ; HD1.13 HD1.14 ; v2(59.817,89.662) 59.826,89.671 61.947,89.671 U6.GND ; v2@59.897,119.681 v2(59.944,119.634) 59.967,119.657 61.933,119.657 U5.GND ; v2(59.944,29.718) 59.963,29.699 61.937,29.699 U8.GND ; v2@60.024,60.499 v2(60.071,60.452) 60.138,60.452 60.259,60.33 U7.TEST U7.GND 63.74,59.68 C7.1 ; U8.TEST U8.GND ; U6.TEST U6.GND ; U5.TEST U5.GND ; C8.1 63.74,29.68 U8.GND ; C6.1 63.74,89.68 U6.GND ; C5.1 63.74,119.68 U5.GND ; v2(90.043,29.591) 90.748,29.591 90.837,29.68 U12.GND ; v2(90.043,89.535) v2@90.09,89.582 ; v2(90.17,59.69) 90.175,59.685 91.951,59.685 U11.GND ; 90.255,89.68 U10.GND ; v2(90.424,120.269) 90.455,120.3 91.925,120.3 U9.TEST U9.GND 93.74,119.68 C9.1 ; U12.TEST U12.GND ; U11.TEST U11.GND ; U10.TEST U10.GND ; C12.1 93.74,29.68 U12.GND ; C11.1 93.74,59.68 U11.GND ; C10.1 93.74,89.68 U10.GND ; U18.8@101.743,70.612 101.165,71.19 101.165,73.73 101.8,74.365 102.895,74.365 103.022,74.492 103.022,75.508 102.895,75.635 U18.4 ; U18.8@101.8,70.555 U18.8 ; U18.8@102.489,70.555 102.616,70.428 v2(102.616,68.453) 102.663,68.406 102.663,68.025 102.743,67.945 ; v2(119.888,89.662) v2@119.897,89.671 ; v2@119.935,89.709 v2@119.897,89.671 ; v2(120.269,60.706) 120.336,60.706 120.711,60.33 U15.TEST U15.GND 123.74,59.68 C15.1 ; 120.269,119.955 120.015,119.701 v2(120.015,119.634) 120.755,119.634 120.801,119.68 U13.GND ; v2@120.476,29.544 v2(120.523,29.591) 121.154,29.591 121.206,29.643 121.918,29.643 U16.GND ; U16.TEST U16.GND ; U14.TEST U14.GND ; U13.TEST U13.GND ; C16.1 123.74,29.68 U16.GND ; C14.1 123.74,89.68 U14.GND ; C13.1 123.74,119.68 U13.GND ; U17.8@41.8,70.555 U17.8@41.981,70.555 ; v2@119.897,89.671 121.947,89.671 U14.GND
  GND w0.254: v2@89.996,29.544 v2(90.043,29.591) ; v2@90.17,59.623 v2(90.17,59.69) ; HD2.5 HD2.6 ; HD2.9 HD2.10 ; HD2.13 HD2.14 ; v2@120.523,29.464 v2(120.523,29.591)
  other v1: 24,8 32,8 64,8 72,8 80,8 88,8 96,8 104,8 112,8 120,8 128,8 28,16 36,16 52,16 60,16 68,16 84,16 92,16 100,16 108,16 124,16 132,16 24,24 40,24 48,24 56,24 64,24 72,24 88,24 112,24 120,24 128,24 28,32 52,32 60,32 68,32 92,32 132,32 24,40 32,40 40,40 48,40 56,40 64,40 80,40 88,40 28,48 36,48 60,48 100,48 124,48 132,48 24,56 40,56 64,56 72,56 80,56 88,56 128,56 60,64 92,64 100,64 116,64 124,64 132,64 24,72 40,72 56,72 64,72 72,72 80,72 88,72 96,72 104,72 112,72 120,72 128,72 28,80 36,80 60,80 84,80 92,80 100,80 124,80 132,80 24,88 32,88 48,88 72,88 80,88 88,88 96,88 104,88 112,88 120,88 28,96 60,96 68,96 84,96 100,96 116,96 124,96 132,96 24,104 32,104 40,104 56,104 64,104 72,104 80,104 88,104 104,104 112,104 120,104 28,112 44,112 84,112 92,112 100,112 116,112 124,112 132,112 24,120 40,120 48,120 72,120 80,120 104,120 128,120 28,128 36,128 44,128 52,128 60,128 68,128 76,128 84,128 92,128 100,128 108,128 116,128 124,128 132,128
  other v4: 20,10 132,10 20,120
SENS1: U1.CS U17.15 | length 51.1
  Top Layer w0.254: U1.CS 28.031,119.03 40.259,106.802 48.835,98.226 48.835,78.81 48.2,78.175 U17.15 U17.15@47.337,78.302
SENS2: U2.CS U17.14 | length 25
  Top Layer w0.254: U2.CS 28.064,89.03 31.242,85.852 37.973,85.852 46.6,77.225 46.6,77.032 46.727,76.905 U17.14
SENS3: U3.CS U17.13 | length 39.8
  Top Layer w0.254: U3.CS 28.031,59.03 31.454,55.607 36.049,55.607 v2(36.576,56.134) ; U17.13@46.727,75.635 50.222,75.635 v2(50.8,75.057)
  GND w0.254: v2(36.576,56.134) 50.8,70.358 v2(50.8,75.057)
SENS4: U4.CS U17.12 | length 58.4
  Top Layer w0.254: U4.CS 27.518,29.068 26.812,29.068 26.475,29.405 26.475,42.604 38.481,54.61 v2(38.481,59.563) ; U17.12@46.727,74.365 49.079,74.365 v2(49.655,73.789)
  GND w0.254: v2(38.481,59.563) 49.655,70.737 v2(49.655,73.789)
SENS5: U5.CS U17.11 | length 52.1
  Top Layer w0.254: U17.11 50.235,73.095 52.451,75.311 52.451,114.554 56.89,118.993 57.518,118.993 U5.CS
SENS6: U6.CS U17.10 | length 23.5
  Top Layer w0.254: U17.10 50.616,71.825 56.007,77.216 56.007,87.956 57.081,89.03 U6.CS
SENS7: U7.CS U17.9 | length 16.6
  Top Layer w0.254: U17.9 47.591,70.428 48.444,70.428 51.562,67.31 51.562,64.342 56.836,59.068 57.518,59.068 U7.CS
SENS8: U8.CS U17.7 | length 50.7
  Top Layer w0.254: U17.7 43.273,71.825 58.637,56.461 58.637,29.429 58.275,29.068 57.593,29.068 U8.CS
SENS9: U9.CS U18.15 | length 51.5
  Top Layer w0.254: U9.CS 88.084,119.03 109.347,97.767 109.347,79.322 108.2,78.175 U18.15 U18.15@107.382,78.257
SENS10: U10.CS U18.14 | length 25
  Top Layer w0.254: U10.CS 88.389,89.03 94.322,83.097 100.667,83.097 106.6,77.164 106.6,77.032 106.727,76.905 U18.14
SENS11: U11.CS U18.13 | length 34.4
  Top Layer w0.254: U11.CS 88.031,59.03 90.8,56.261 96.52,56.261 105.41,65.151 105.41,74.318 106.727,75.635 U18.13
SENS12: U12.CS U18.12 | length 54.5
  Top Layer w0.254: U12.CS@87.518,29.068 U12.CS 87.593,29.068 88.275,29.068 96.906,37.699 96.906,54.615 106.045,63.754 106.045,73.683 106.727,74.365 U18.12
SENS13: U13.CS U18.11 | length 50.9
  Top Layer w0.254: U18.11 108.2,73.095 112.685,77.58 112.685,114.717 116.9,118.932 116.93,118.932 117.028,119.03 U13.CS
SENS14: U14.CS U18.10 | length 22.5
  Top Layer w0.254: U18.10 107.495,71.857 108.687,71.857 115.57,78.74 115.57,87.757 116.806,88.993 117.518,88.993 U14.CS
SENS15: U15.CS U18.9 | length 16.5
  Top Layer w0.254: U18.9 108.2,70.555 108.327,70.428 108.327,70.362 109.474,69.215 109.474,66.421 116.827,59.068 117.518,59.068 U15.CS
SENS16: U16.CS U18.7 | length 50.8
  Top Layer w0.254: U18.7 102.663,71.698 103.435,71.698 103.908,71.225 103.908,67.332 v2(103.886,67.31) ; v2(103.886,46.101) 103.886,40.386 115.204,29.068 117.518,29.068 U16.CS
  GND w0.254: v2(103.886,46.101) v2(103.886,67.31)
SPI1_MISO: HD1.7 R17.2 U1.SDO U2.SDO U3.SDO U4.SDO U5.SDO U6.SDO U7.SDO U8.SDO | length 330.8
  Top Layer w0.254: U4.SDO 29.3,29.68 34.418,34.798 40.132,34.798 v2(43.942,38.608) 52.87,29.68 U8.SDO ; U3.SDO 27.518,59.643 26.836,59.643 26.416,59.222 26.416,56.134 v2(28.194,54.356) ; U2.SDO 29.228,89.68 v2(41.275,101.727) ; U1.SDO 27.593,119.643 28.693,119.643 38.227,110.109 v2(44.45,110.109) 44.472,110.087 44.682,110.087 54.275,119.68 U5.SDO ; R17.2@38.773,5.588 38.773,5.738 42.328,9.294 42.328,9.708 HD1.7 ; v2(54.864,90.678) 55.862,89.68 U6.SDO ; U7.SDO 57.593,59.643 58.275,59.643 59.436,58.482 v2(59.436,54.102)
  GND w0.254: v2(41.275,101.727) 41.275,106.934 v2(44.45,110.109) ; HD1.7 41.35,11.27 41.35,17.451 35.052,23.749 35.052,80.391 44.45,89.789 v2(44.45,110.109) ; v2(54.864,90.678) 51.435,94.107 51.435,103.124 v2(44.45,110.109)
  VCC w0.254: v2(28.194,54.356) v2(43.942,38.608) 44.009,38.608 59.436,54.035 v2(59.436,54.102)
  Bottom Layer w0.254: HD1.7 43.89,11.27 43.89,24.88 43.942,24.932 v2(43.942,38.608)
SPI1_MOSI: HD1.3 U1.SDI U2.SDI U3.SDI U4.SDI U5.SDI U6.SDI U7.SDI U8.SDI | length 350.9
  Top Layer w0.254: U2.SDI@27.518,90.293 U2.SDI 27.593,90.368 28.519,90.368 v2(38.227,100.076) ; U1.SDI@27.518,120.293 U1.SDI 29.276,120.33 v2(36.83,112.776) ; U4.SDI 28.806,30.33 v2(42.672,44.196) 56.538,30.33 U8.SDI ; U3.SDI 28.693,60.33 30.26,58.764 30.39,58.764 v2(32.004,57.15) ; HD1.3@37.248,10.292 HD1.3 ; v2(53.467,98.806) 53.467,93.605 56.704,90.368 57.518,90.368 U6.SDI U6.SDI@57.593,90.293 ; v2(56.896,111.125) 58.637,112.866 58.637,119.931 58.275,120.293 57.593,120.293 U5.SDI U5.SDI@57.518,120.293 ; U7.SDI 57.593,60.293 58.344,60.293 60.198,58.438 v2(60.198,53.594)
  GND w0.254: HD1.3@37.192,9.652 HD1.3@37.338,9.652 ; v2(42.672,44.196) 42.672,44.263 42.799,44.39 42.799,46.609 47.752,51.562 58.166,51.562 v2(60.198,53.594)
  VCC w0.254: v2(32.004,57.15) 39.37,49.784 39.37,47.498 v2(42.672,44.196) ; v2(36.83,112.776) 45.847,103.759 v2(49.403,103.759) ; v2(38.227,100.076) 39.247,101.096 46.74,101.096 v2(49.403,103.759) ; v2(56.896,111.125) 56.849,111.078 56.722,111.078 v2(49.403,103.759)
  Bottom Layer w0.254: v2(42.672,44.196) 42.672,25.654 38.81,21.792 38.81,11.27 HD1.3 39.666,7.874 55.499,7.874 62.992,15.367 62.992,80.01 49.403,93.599 v2(49.403,103.759) 53.467,99.695 v2(53.467,98.806)
SPI1_SCK: HD1.11 U1.SCK U2.SCK U3.SCK U4.SCK U5.SCK U6.SCK U7.SCK U8.SCK | length 361.9
  Top Layer w0.254: U1.SCK@27.512,120.936 U1.SCK 28.031,120.98 31.765,124.714 41.783,124.714 48.133,118.364 v2(48.133,116.967) 50.292,116.967 54.305,120.98 U5.SCK 57.6,120.936 58.282,120.936 ; U4.SCK 28.031,30.98 43.787,46.736 v2(44.45,46.736) ; U3.SCK 28.031,60.98 31.44,64.389 38.481,64.389 44.45,58.42 v2(44.45,46.736) ; U2.SCK 27.654,91.078 28.129,91.078 39.243,102.192 v2(39.243,103.124) ; HD1.11@47.408,10.292 HD1.11 HD1.11@47.984,9.716 ; v2(55.499,105.029) 55.499,92.562 57.081,90.98 U6.SCK ; U8.SCK 57.467,31.069 56.688,31.069 52.832,34.925 52.832,41.148 47.244,46.736 v2(44.45,46.736) ; U7.SCK 57.6,60.936 58.419,60.936 60.829,58.526 60.829,51.431 v2(59.944,50.546)
  GND w0.254: v2(39.243,103.124) 39.243,109.601 46.609,116.967 v2(48.133,116.967) 48.133,112.395 v2(55.499,105.029) ; HD1.11@47.992,10.583 HD1.11@47.7,10.292 ; HD1.11@48.265,10.292 HD1.11@47.7,10.292 ; v2(59.944,50.546) 57.658,48.26 45.974,48.26 v2(44.45,46.736) 46.43,44.756 46.43,11.27 HD1.11 HD1.11@47.7,10.292
  Bottom Layer w0.254: HD1.11 48.97,11.27 48.97,63.7 46.736,65.934 46.736,115.57 v2(48.133,116.967)
SPI2_MISO: HD2.7 R18.2 U9.SDO U10.SDO U11.SDO U12.SDO U13.SDO U14.SDO U15.SDO U16.SDO | length 352.9
  Top Layer w0.254: U12.SDO 87.518,29.718 86.836,29.718 86.475,30.079 86.475,30.111 85.344,31.242 85.344,41.402 v2(95.504,51.562) ; U11.SDO 89.164,59.68 v2(91.694,57.15) ; U10.SDO 89.172,89.68 99.14,99.648 99.707,99.648 v2(99.754,99.695) ; U9.SDO 87.593,119.643 88.764,119.643 100.457,107.95 104.14,107.95 v2(108.204,103.886) 108.204,112.522 115.325,119.643 117.518,119.643 U13.SDO ; v2(105.029,48.133) 105.029,40.513 115.862,29.68 U16.SDO ; v2(106.553,54.991) 108.712,57.15 117.348,57.15 118.637,58.439 118.637,59.281 118.275,59.643 117.593,59.643 U15.SDO ; R18.2 109.893,7.273 HD2.7 ; v2(114.681,89.789) 114.752,89.718 117.518,89.718 U14.SDO
  GND w0.254: v2(99.754,99.695) 104.013,99.695 v2(108.204,103.886) 108.204,29.337 111.35,26.191 111.35,11.27 HD2.7 ; v2(105.029,48.133) 105.029,53.467 v2(106.553,54.991)
  VCC w0.254: v2(91.694,57.15) 104.394,57.15 v2(106.553,54.991) 98.933,54.991 v2(95.504,51.562) ; v2(108.204,103.886) 111.633,100.457 111.633,92.837 v2(114.681,89.789)
  Bottom Layer w0.254: v2(106.553,54.991) 106.553,32.512 113.89,25.175 113.89,11.27 HD2.7
SPI2_MOSI: HD2.3 U9.SDI U10.SDI U11.SDI U12.SDI U13.SDI U14.SDI U15.SDI U16.SDI | length 337
  Top Layer w0.254: U10.SDI@87.518,90.293 U10.SDI 87.593,90.368 88.59,90.368 v2(92.837,94.615) ; U12.SDI 87.593,30.368 88.407,30.368 95.885,37.846 v2(95.885,40.005) ; U11.SDI 87.518,60.293 86.836,60.293 86.475,59.931 86.475,55.003 v2(88.011,53.467) ; U9.SDI 87.593,120.293 89.361,120.293 90.875,118.779 100.815,108.839 v2(100.838,108.839) 112.329,120.33 U13.SDI ; v2(98.679,42.799) 98.679,44.45 110.109,55.88 117.221,55.88 119.507,58.166 119.507,59.309 118.523,60.293 117.593,60.293 U15.SDI ; HD2.3@107.293,9.753 HD2.3 ; v2(107.442,39.497) 116.571,30.368 117.518,30.368 117.593,30.293 118.275,30.293 ; v2(116.713,105.41) 119.126,102.997 119.126,91.087 118.407,90.368 118.275,90.368 117.593,90.368 U14.SDI 117.593,90.293 118.275,90.293
  GND w0.254: v2(88.011,53.467) v2(98.679,42.799) ; v2(92.837,94.615) 92.837,100.838 v2(100.838,108.839) ; v2(95.885,40.005) v2(98.679,42.799) ; HD2.3@107.248,10.292 HD2.3 ; v2(107.442,39.497) 104.14,42.799 v2(98.679,42.799)
  VCC w0.254: v2(100.838,108.839) 101.346,108.331 107.285,108.331 107.539,108.585 113.538,108.585 v2(116.713,105.41)
  Bottom Layer w0.254: v2(98.679,42.799) 98.679,33.401 106.27,25.81 106.27,11.27 HD2.3 108.81,11.27 108.81,25.81 100.838,33.782 v2(100.838,108.839)
SPI2_SCK: HD2.11 U9.SCK U10.SCK U11.SCK U12.SCK U13.SCK U14.SCK U15.SCK U16.SCK | length 374
  Top Layer w0.254: U11.SCK@87.512,60.936 U11.SCK 88.031,60.98 91.948,64.897 v2(99.06,64.897) ; U12.SCK 87.458,31.078 86.905,31.078 86.487,31.496 86.487,39.751 v2(91.567,44.831) ; U10.SCK 88.031,90.98 91.66,94.609 91.66,94.709 v2(91.707,94.756) ; U9.SCK 87.641,121.065 88.426,121.065 91.313,123.952 97.83,123.952 104.775,117.007 104.775,113.494 112.261,120.98 U13.SCK ; v2(104.646,113.54) v2@104.775,113.54 ; v2(114.808,91.44) 115.083,91.44 115.543,90.98 U14.SCK U14.SCK@117.6,90.936 ; U16.SCK 117.561,30.985 118.488,30.985 120.015,32.512 120.015,45.339 v2(110.617,54.737) 117.094,54.737 120.269,57.912 120.269,59.563 118.896,60.936 117.6,60.936 U15.SCK ; HD2.11@117.992,9.708 HD2.11 HD2.11@117.992,10.292
  GND w0.254: v2(91.707,94.756) 91.707,102.121 102.997,113.411 v2@104.646,113.411 ; v2(104.646,113.54) v2@104.646,113.411 ; v2(110.617,54.737) 110.617,41.656 118.97,33.303 118.97,11.27 HD2.11 ; v2(114.808,91.44) 110.109,96.139 110.109,108.966 105.664,113.411 104.775,113.411 v2@104.646,113.411
  VCC w0.254: v2(91.567,44.831) 99.06,52.324 108.204,52.324 v2(110.617,54.737) 100.457,64.897 v2(99.06,64.897)
  Bottom Layer w0.254: v2(104.646,113.54) 104.648,113.538 104.648,112.909 104.775,112.782 104.775,58.674 116.43,47.019 116.43,11.27 HD2.11
pads on no net: HD1.15 HD1.16 HD2.15 HD2.16

## Polygon pours and split planes (outlines as drawn)
GND on VCC "GND_L03_P002" (solid, remove dead copper, pour order 2): 17.907,0 140.589,0 140.589,129.921 136.271,134.239 135.763,133.731 19.431,133.731 14.605,128.905 15.621,127.889 15.621,0 19.304,0 14.478,4.826 0,4.826
GND on Bottom Layer "GND_L04_P003" (solid, remove dead copper, pour order 3): 135.509,134.874 142.621,127.762 140.081,125.222 140.081,1.143 138.938,0 16.256,0 16.256,133.477 17.653,134.874
GND on GND "GND_L02_P001" (solid, remove dead copper, pour order 1): 13.843,136.144 14.605,136.906 142.748,136.906 142.748,9.017 133.731,0 16.637,0 16.637,135.001 18.669,137.033
GND on Top Layer "GND_L01_P004" (solid, pour order 4): 17.272,127.254 23.368,133.35 129.667,133.35 136.398,126.619 136.398,6.477 129.921,0 23.114,0 17.272,5.842 17.272,129.159

## Keep-outs
Keep-Out Layer:
  the board outline again, w0.254

## Silkscreen, mask and mechanical layers (free items; w line width, h text height)
Top Overlay:
  text "(20, 120) mm" at 20.32,109.982 h0.76 r90
  text "3V3" at 105.283,19.812 h0.76 r90
  text "A2" at 107.95,19.812 h0.76 r90
  text "GND" at 110.363,19.812 h0.76 r90
  text "B2" at 113.03,19.812 h0.76 r90
  text "GND" at 115.443,19.812 h0.76 r90
  text "C2" at 118.11,19.812 h0.76 r90
  text "GND" at 120.65,19.812 h0.76 r90
  text "AL11" at 80.518,19.685 h0.76 r90
  text "AL12" at 83.058,19.685 h0.76 r90
  text "AL14" at 85.598,19.685 h0.76 r90
  text "AL16" at 88.138,19.685 h0.76 r90
  text "3V3" at 35.179,19.558 h0.76 r90
  text "A1" at 37.973,19.558 h0.76 r90
  text "GND" at 40.386,19.558 h0.76 r90
  text "B1" at 42.926,19.558 h0.76 r90
  text "GND" at 45.466,19.558 h0.76 r90
  text "C1" at 47.879,19.558 h0.76 r90
  text "GND" at 50.673,19.558 h0.76 r90
  text "AL3" at 70.358,19.431 h0.76 r90
  text "AL4" at 72.898,19.431 h0.76 r90
  text "AL7" at 75.438,19.431 h0.76 r90
  text "AL8" at 77.978,19.431 h0.76 r90
  text "AL1" at 70.358,16.383 h0.76 r90
  text "AL2" at 72.898,16.383 h0.76 r90
  text "AL5" at 75.438,16.383 h0.76 r90
  text "AL6" at 77.978,16.383 h0.76 r90
  text "AL9" at 80.518,16.383 h0.76 r90
  text "AL13" at 85.598,16.383 h0.76 r90
  text "AL15" at 88.138,16.383 h0.76 r90
  text "3V3" at 35.179,16.256 h0.76 r90
  text "MOSI" at 37.973,16.256 h0.76 r90
  text "GND" at 40.386,16.256 h0.76 r90
  text "MISO" at 42.926,16.256 h0.76 r90
  text "GND" at 45.466,16.256 h0.76 r90
  text "SCK" at 48.006,16.256 h0.76 r90
  text "GND" at 50.673,16.256 h0.76 r90
  text "AL10" at 83.058,16.256 h0.76 r90
  text "3V3" at 105.283,16.256 h0.76 r90
  text "MOSI" at 107.95,16.256 h0.76 r90
  text "GND" at 110.363,16.256 h0.76 r90
  text "MISO" at 113.03,16.256 h0.76 r90
  text "GND" at 115.443,16.256 h0.76 r90
  text "SCK" at 118.11,16.256 h0.76 r90
  text "GND" at 120.65,16.256 h0.76 r90
  text "(20, 10) mm" at 20.32,11.811 h0.76 r90
  text "SPI2" at 130.175,9.652 h0.76 r90
  text "SPI1" at 59.855,9.439 h0.76 r90